# EAGLE board Amp_Master_PCB_rev1 (EAGLE 9.7.0)
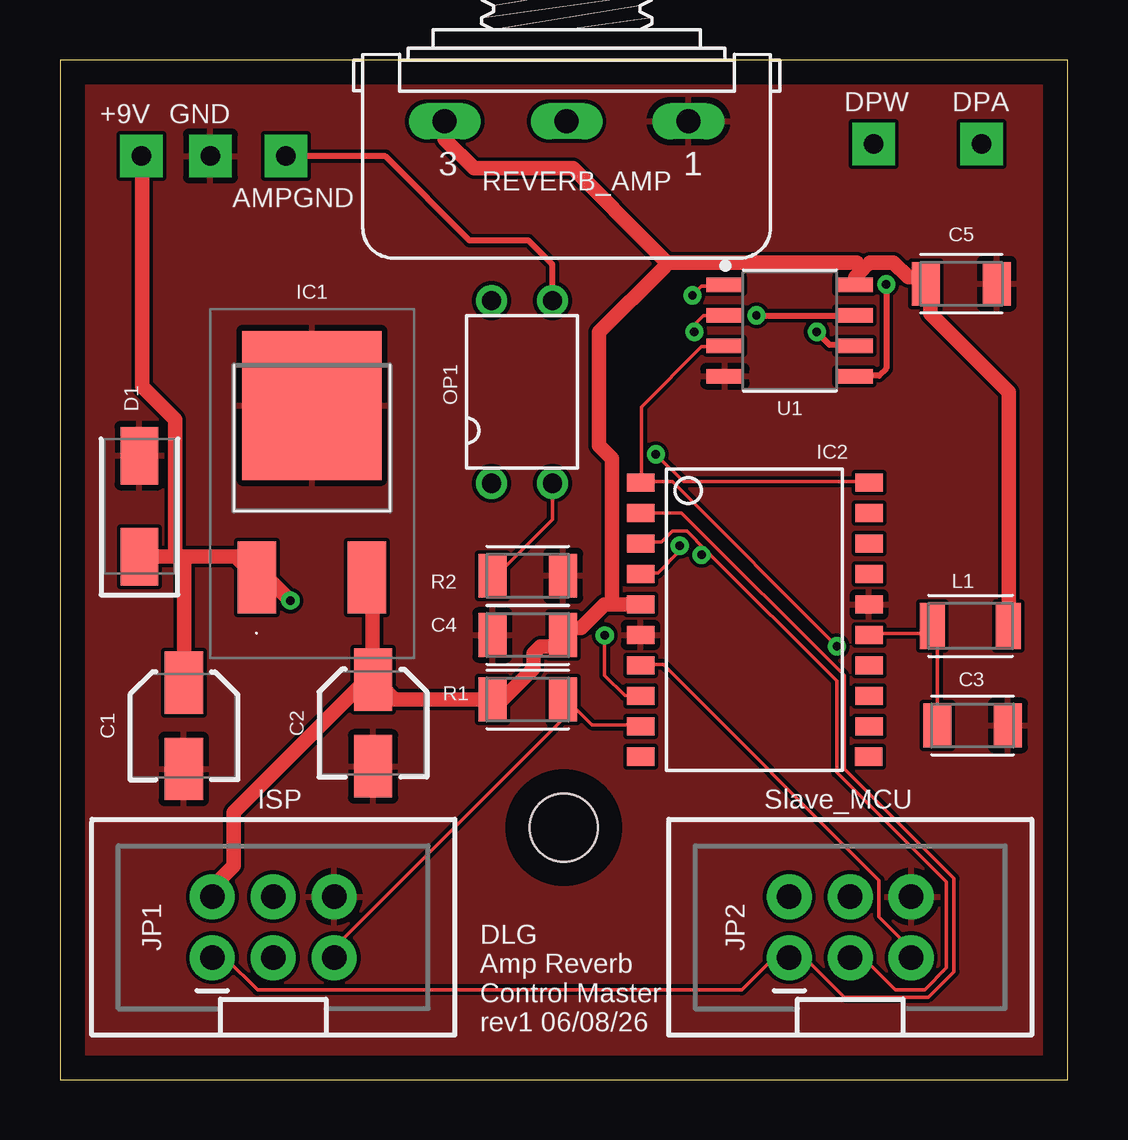
[diagram p0: board, top side]
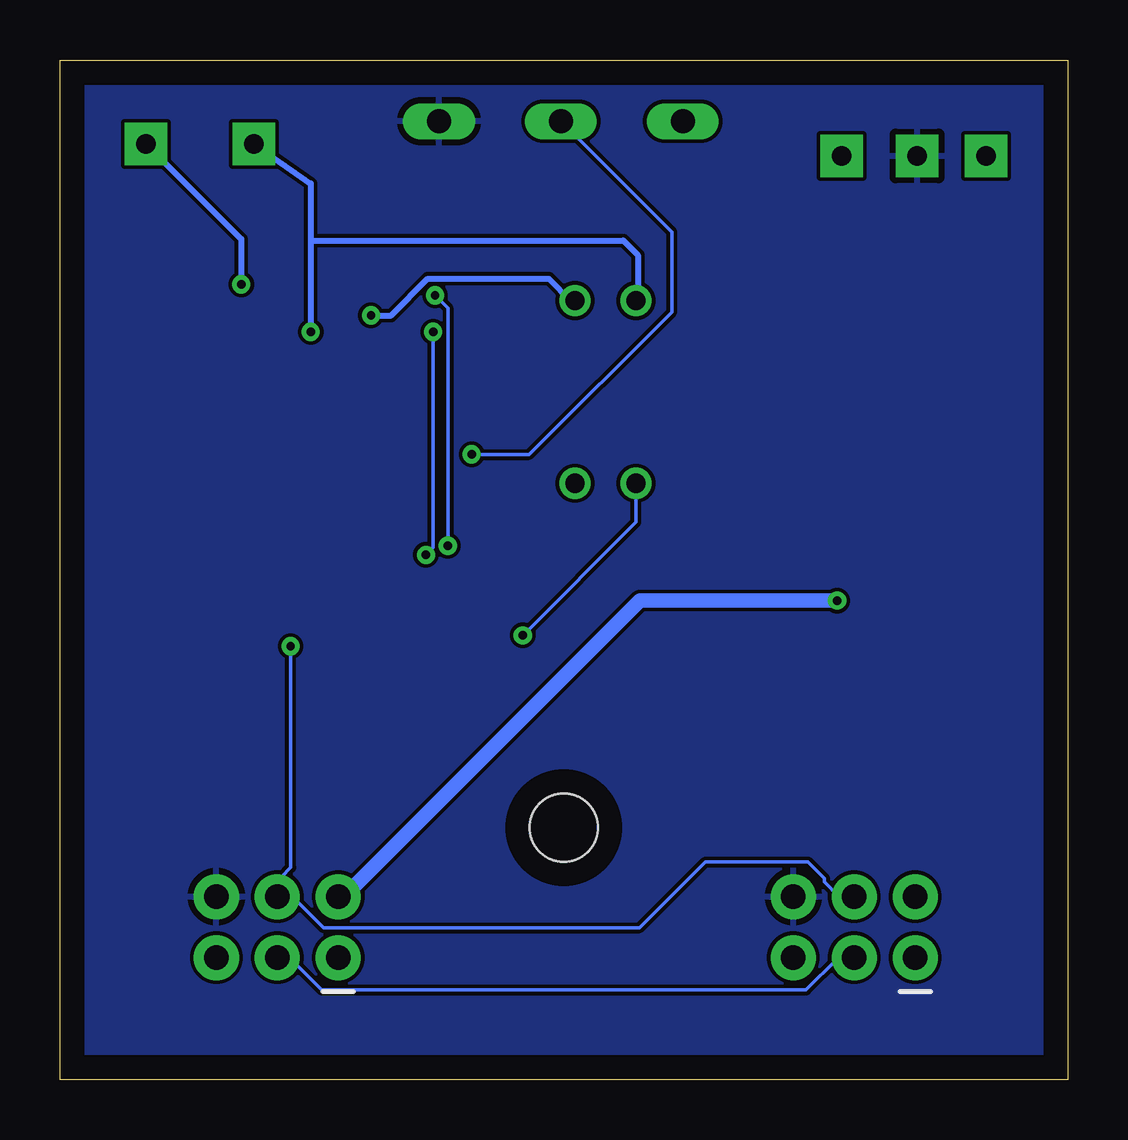
[diagram p1: board, bottom side, seen from below]

Size 42 x 42.5 mm. Coordinates in mm from the lower left corner, seen from the top.
Outline: 0,0 42,0 42,42.5 0,42.5 0,0
Copper layers (1*16): Top 0.035mm / dielectric 1.5mm / Bottom 0.035mm
Design rules "Fusion Electronics Design Rules": minimum track width 6mil, minimum drill 0.35mm, track to track 6mil, track to pad 6mil, pad to pad 6mil, via to via 6mil, smd to smd 6mil, copper to edge 40mil, drill to drill 6mil, minimum pad ring 10mil, minimum via ring 8mil, stop-mask expansion 4mil, vias tented up to drill 9999mil, thermal gap 10mil
Net classes: 1 Power: width 0.6 mm; 2 Audio Signal: width 0.254 mm
Holes 2.84 mm at 21,10.5

## Footprints (pad centres in the part's own frame; a part is rotated, then mirrored left to right if it is on the bottom)
SQUARE_0.813MM = drill 0.812 pad 1.778 square: 1 0,0
CAPAE430X430N = smd 2.6 x 1.6: 1 -1.8,0; 2 1.8,0
CAPC3216X135 = smd 1.165 x 1.815: 1 -1.475,0; 2 1.475,0
DIOM5226X290N = smd 2.392 x 1.565: 1 -2.108,0; 2 2.108,0
LM317MADTRKG = smd 3 x 1.6: 1 4.08,-2.285; 3 4.08,2.285 | smd 6.2 x 5.8: 2 -3.1,0
SO20L = smd 0.762 x 1.143: 1 -5.08,-5.131; 2 -3.81,-5.131; 3 -2.54,-5.131; 4 -1.27,-5.131; 5 0,-5.131; 6 1.27,-5.131; 7 2.54,-5.131; 8 3.81,-5.131; 9 5.08,-5.131; 10 6.35,-5.131; 11 6.35,4.369; 12 5.08,4.394; 13 3.81,4.394; 14 2.54,4.394; 15 1.27,4.394; 16 0,4.394; 17 -1.27,4.394; 18 -2.54,4.394; 19 -3.81,4.394; 20 -5.08,4.394
2X3-SHROUDED = drill 1.016 pad 1.88: 1 -1.27,2.54; 2 1.27,2.54; 3 -1.27,0; 4 1.27,0; 5 -1.27,-2.54; 6 1.27,-2.54
INDC3216X190 = smd 1.043 x 1.91: 1 -1.584,0; 2 1.584,0
DIP4 = drill 0.8: 1 -1.27,-3.81; 2 1.27,-3.81; 3 1.27,3.81; 4 -1.27,3.81
RESC3216X70 = smd 1.165 x 1.815: 1 -1.475,0; 2 1.475,0
16MM-PCB-MOUNT = drill 1 long: 1 5.08,0; 2 0,0; 3 -5.08,0
SOIC127P600X175-8N = smd 1.55 x 0.6: 1 -2.7,1.905; 2 -2.7,0.635; 3 -2.7,-0.635; 4 -2.7,-1.905; 5 2.7,-1.905; 6 2.7,-0.635; 7 2.7,0.635; 8 2.7,1.905

## Placement (x,y rotation side)
+9V  [SQUARE_0.813MM]  3.39,38.5 0 top
AMPGND  [SQUARE_0.813MM]  9.41,38.5 0 top
C1  47uF  [CAPAE430X430N]  5.16,14.75 270 top
C2  1uF  [CAPAE430X430N]  13.05,14.86 270 top
C3  0.1uF  [CAPC3216X135]  38.04,14.76 180 top
C4  0.1uF  [CAPC3216X135]  19.5,18.53 180 top
C5  0.1uF  [CAPC3216X135]  37.57,33.17 0 top
D1  1N4001  [DIOM5226X290N]  3.31,23.9 90 top
DPA  [SQUARE_0.813MM]  38.41,39 0 top
DPW  [SQUARE_0.813MM]  33.91,39 0 top
GND  [SQUARE_0.813MM]  6.27,38.5 0 top
IC1  MC7805BDTRKG  [LM317MADTRKG]  10.5,25 270 top
IC2  TINY26S  [SO20L]  29.33,19.8 270 top
JP1  ISP  [2X3-SHROUDED]  8.89,6.35 90 top
JP2  Slave_MCU  [2X3-SHROUDED]  32.94,6.35 90 top
L1  10uH  [INDC3216X190]  37.95,18.91 180 top
OP1  TLP3555  [DIP4]  19.26,28.66 0 top
R1  10k  [RESC3216X70]  19.5,15.84 180 top
R2  300R  [RESC3216X70]  19.5,21 180 top
REVERB_AMP  100k  [16MM-PCB-MOUNT]  21.12,39.94 0 top
U1  MCP41100_SOIC-8  [SOIC127P600X175-8N]  30.42,31.22 0 top

## Library data of the parts
+9V AMPGND DPA DPW GND = gm-supply
C1 C2 = Capacitor; CATEGORY_L1: Capacitor; CATEGORY_L2: Aluminum Electrolytic Capacitors; CATEGORY_L3: Radial Can; DESCRIPTION: ECAP (Aluminum Electrolytic Capacitor), 0.157" Dia (4.00mm) body Size, 0.217" (5.50mm) Height - Seated (Max), 0.169" L x 0.169" W (4.30mm x 4.30mm) Surface Mount Land Size; PACKAGE: Surface Mount
C3-C5 = Capacitor; CATEGORY_L1: Capacitor; CATEGORY_L2: Ceramic Capacitors; CATEGORY_L3: MLCC; PACKAGE: Surface Mount; PACKAGE_SIZE: 1206
D1 = Diode; CATEGORY_L1: Diodes; CATEGORY_L2: Rectifiers; CATEGORY_L3: Ultra Fast Recovery Rectifiers; DATASHEET: https://www.onsemi.com/download/data-sheet/pdf/es1d-d.pdf; DESCRIPTION: Diode 200 V 1A Surface Mount DO-214AC (SMA); FORWARD_CURRENT: 1A; FORWARD_VOLTAGE: 920mV; MANUFACTURER: onsemi; MPN: ES1D; OPERATING_TEMPERATURE: -55°C ~ 150°C; PACKAGE: Surface Mount; PART_STATUS: Active; REVERSE_VOLTAGE: 200V; ROHS: Compliant; SERIES: ES1D
IC1 = MC7805BDTRKG; DESCRIPTION: Output Current in Excess of 1.0 A; No External Components Required; Internal Thermal Overload Protection; Internal Short Circuit Current Limiting; Output Transistor Safe-Area Compensation; Output Voltage Offered in 2% and 4% Tolerance; Pb-Free Packages are Available; HEIGHT: 2.38mm; MANUFACTURER_NAME: onsemi; MANUFACTURER_PART_NUMBER: MC7805BDTRKG; MOUSER_PART_NUMBER: 863-MC7805BDTRKG; MOUSER_PRICE-STOCK: https://www.mouser.co.uk/ProductDetail/onsemi/MC7805BDTRKG?qs=%252B9%2Fcbd0IE0RVSCV5SBH6%2FA%3D%3D
IC2 = atmel; MPN: ATTINY261-20SU; OC_FARNELL: 1455147; OC_NEWARK: 58M3783
JP1 JP2 = SparkFun-Connectors; PROD_ID: CONN-14886
L1 = Inductor; CATEGORY_L1: Inductors; DESCRIPTION: Chip 3.20 X 1.60 X 1.90 mm body 1206(3216-METRIC); PACKAGE: Surface Mount; PACKAGE_SIZE: 1206
OP1 = Opto-Electronic; CATEGORY_L1: Optoelectronics; CATEGORY_L2: Optocouplers; CATEGORY_L3: Transistor Photovoltaic Output Optoisolators; DATASHEET: https://www.onsemi.com/pdf/datasheet/fod814-d.pdf; MANUFACTURER: onsemi
R1 R2 = Resistor; CATEGORY_L1: Resistors; DESCRIPTION: Chip Resistor 3.20 X 1.60 X 0.70 mm body 1206(3216-METRIC) Package; PACKAGE: Surface Mount; PACKAGE_SIZE: 1206
REVERB_AMP = gm-pots
U1 = IC_Data-Conversion; CATEGORY_L1: Data Conversion IC; CATEGORY_L2: Data Acquisition; CATEGORY_L3: Digital Potentiometers; DATASHEET: https://ww1.microchip.com/downloads/en/DeviceDoc/22060b.pdf; DESCRIPTION: Digital Potentiometer 10k Ohm 1 Circuit 129 Taps SPI Interface 8-SOIC; MANUFACTURER: Microchip Technology; MPN: MCP4131-103E/SN; OPERATING_TEMPERATURE: -40°C ~ 125°C; PACKAGE: Surface Mount; PACKAGE_SIZE: 8-SOIC; PART_STATUS: Active; ROHS: Compliant; SERIES: MCP41X; THERMALLOSS: 0.4 W

## Nets
+5V [Power]: C2.1 C4.1 C5.1 IC1.3 IC2.5 JP1.2 L1.1 R1.2 REVERB_AMP.3 U1.8
+5V1: C3.2 IC2.15 L1.2
+9V [Power]: +9V.1 C1.1 D1.1 IC1.1 JP2.2
AMPGND [Audio Signal]: AMPGND.1 OP1.3 U1.7
CS: IC2.4 U1.1
DPW [Audio Signal]: DPW.1 OP1.4 U1.6
GND [Power]: C1.2 C2.2 C3.1 C4.2 C5.2 D1.2 GND.1 IC1.2 IC2.6 IC2.16 JP1.6 JP2.6 R2.1 REVERB_AMP.1 U1.4
MISO: IC2.2 JP1.1 JP2.1
MOSI: IC2.1 JP1.4 JP2.4 U1.3
N$1: IC2.20 REVERB_AMP.2
N$2: IC2.8 OP1.1
N$3: OP1.2 R2.2
N$6 [Audio Signal]: DPA.1 U1.5
RESET: IC2.9 JP1.5 R1.1
SCK: IC2.3 JP1.3 JP2.3 U1.2
SDO: IC2.7 JP2.5

## Tracks (layer width: path | path; a pad name or v marks a point on that pad's centre or on a via)
+5V
  Top 0.6: 23.01,19.81 22.71,19.81 21.72,18.82 21.26,18.82 21.03,18.59 C4.1 20.88,18.29 20.65,18.06 20.04,18.06 19.74,17.75 19.74,17.14 18.44,15.85 18.06,15.85 R1.2 17.75,15.85 13.95,15.85 13.26,16.54 C2.1 | 23.01,19.81 24.16,19.81 IC2.5 | C2.1 13.03,16.69 13.03,20.65 12.8,20.88 IC1.3 | JP1.2 6.4,7.62 6.4,8.08 7.24,8.91 7.24,11.12 12.72,16.61 C2.1 | 33.49,33.8 33.76,34.06 34.75,34.06 35.36,33.45 35.81,33.45 36.04,33.22 C5.1 36.27,32.92 36.27,31.93 39.55,28.65 39.55,18.97 L1.1 | 33.49,33.8 33.15,33.45 33.15,33.15 U1.8 | 25.3,34.06 33.22,34.06 33.49,33.8 | 25.3,34.06 25.15,33.83 22.46,31.15 22.46,26.43 23.01,25.88 23.01,19.81 | 25.3,34.06 24.8,34.56 21.38,37.98 20.73,37.98 17.25,37.98 16.04,39.2 REVERB_AMP.3
+5V1
  Top 0.152: IC2.15 33.76,18.59 36.04,18.59 36.35,18.9 L1.2 36.12,18.59 36.58,18.14 36.58,14.78 C3.2
+9V  (via drill 0.35)
  Top 0.6: 5.18,21.79 7.32,21.79 8.15,20.95 IC1.1 8.53,20.88 8.69,20.88 v9.6,19.96 | 5.18,21.79 4.8,21.79 | 4.8,21.79 3.35,21.79 D1.1 | 5.18,21.79 5.18,16.61 C1.1 | 4.8,21.79 4.8,27.51 3.43,28.88 3.43,38.48 +9V.1
  Bottom 0.6: JP2.2 30.18,7.62 17.83,19.96 v9.6,19.96
AMPGND  (via drill 0.35)
  Top 0.254: v29.03,31.85 33.07,31.85 U1.7 | AMPGND.1 9.48,38.48 13.56,38.48 17.07,34.98 19.52,34.98 20.53,33.97 OP1.3
  Bottom 0.254: v29.03,31.85 28.19,31.85 26.67,33.38 21.62,33.38 20.71,32.47 OP1.3
CS  (via drill 0.35)
  Top 0.152: v25.83,22.25 25.83,22.02 24.92,21.11 24.23,21.11 IC2.4 | v26.36,32.69 26.75,33.07 27.66,33.07 U1.1
  Bottom 0.152: v25.83,22.25 25.83,32.16 v26.36,32.69
DPW  (via drill 0.35)
  Top 0.254: v31.55,31.17 32.08,30.63 33.07,30.63 U1.6
  Bottom 0.254: 31.55,34.98 31.55,37.35 DPW.1 | 31.55,34.98 v31.55,31.17 | OP1.4 17.91,32.55 17.91,34.37 18.52,34.98 31.55,34.98
GND
  pour Top: 0.08,0.08 41.92,0.08 41.92,42.42 0.08,42.42
  pour Bottom: 0.08,0.08 41.92,0.08 41.92,42.42 0.08,42.42
MISO
  Top 0.152: IC2.2 24.23,23.62 25.91,23.62 32.69,16.84 32.69,12.95 37.26,8.38 37.26,4.5 36.2,3.43 32.69,3.43 31.09,5.03 30.4,5.03 JP2.1 30.33,5.03 29.72,5.03 28.42,3.73 8.23,3.73 6.93,5.03 6.4,5.03 JP1.1
MOSI  (via drill 0.35)
  Top 0.152: U1.3 27.66,30.56 26.75,30.56 24.23,28.04 24.23,24.92 IC2.1 24.31,24.92 25.53,24.92 v32.38,18.06
  Bottom 0.152: JP1.4 9.53,7.62 10.13,8.23 10.13,8.38 10.82,9.07 15.09,9.07 17.84,6.33 31.01,6.33 32.31,7.62 32.77,7.62 | 32.77,7.62 JP2.4 32.92,7.62 | v32.38,18.06 32.38,8.84 32.77,8.46 32.77,7.62
N$1  (via drill 0.35)
  Top 0.152: v24.84,26.06 25.98,24.92 33.68,24.92 IC2.20
  Bottom 0.152: v24.84,26.06 22.44,26.06 16.5,32 16.5,35.32 REVERB_AMP.2 20.66,39.48 20.64,39.48
N$2  (via drill 0.35)
  Top 0.152: v22.71,18.52 22.71,16.84 23.55,16 24.16,16 IC2.8
  Bottom 0.152: v22.71,18.52 17.99,23.23 OP1.1
N$3
  Top 0.152: R2.2 18.06,21.03 18.21,21.03 20.09,22.91 20.15,22.97 20.53,23.35 OP1.2
N$6  (via drill 0.35)
  Top 0.254: v34.44,33.15 34.44,29.64 34.14,29.34 33.15,29.34 U1.5
  Bottom 0.254: v34.44,33.15 34.44,35.03 DPA.1
RESET
  Top 0.152: IC2.9 24.16,14.78 22.17,14.78 21.18,15.77 21.03,15.77 R1.1 21.41,15.47 11.43,5.49 JP1.5
SCK  (via drill 0.35)
  Top 0.152: 26.94,22.06 32.38,16.61 32.38,12.8 36.96,8.23 36.96,4.65 36.04,3.73 34.82,3.73 33.53,5.03 32.99,5.03 JP2.3 | 26.94,22.06 26.14,22.86 25.53,22.86 25.07,22.4 24.23,22.4 IC2.3 | v26.44,31.17 26.44,31.47 26.82,31.85 27.66,31.85 U1.2 | 26.94,22.06 v26.75,21.87
  Bottom 0.152: v26.44,31.17 26.44,22.17 v26.75,21.87 | JP1.3 8.91,5.03 9.6,5.03 10.9,3.73 31.09,3.73 32.38,5.03 32.92,5.03 JP2.3
SDO
  Top 0.152: IC2.7 24.23,17.3 25.15,17.3 34.14,8.31 34.14,6.78 35.43,5.49 35.43,5.11 JP2.5

## Text on the board
tPlace: DLG / Amp Reverb / Control Master / rev1 06/08/26